# Altium PCB PCB1.PcbDoc
Units mm, origin at the board's own origin, x right, y up, seen from the top; angles counter-clockwise.
Board outline 50 x 35 mm, 2 copper layers (Top Layer, Bottom Layer); 40 components, 19 nets, 116 pads, 11 vias.
Unrouted connection lines stored in the file: 2.
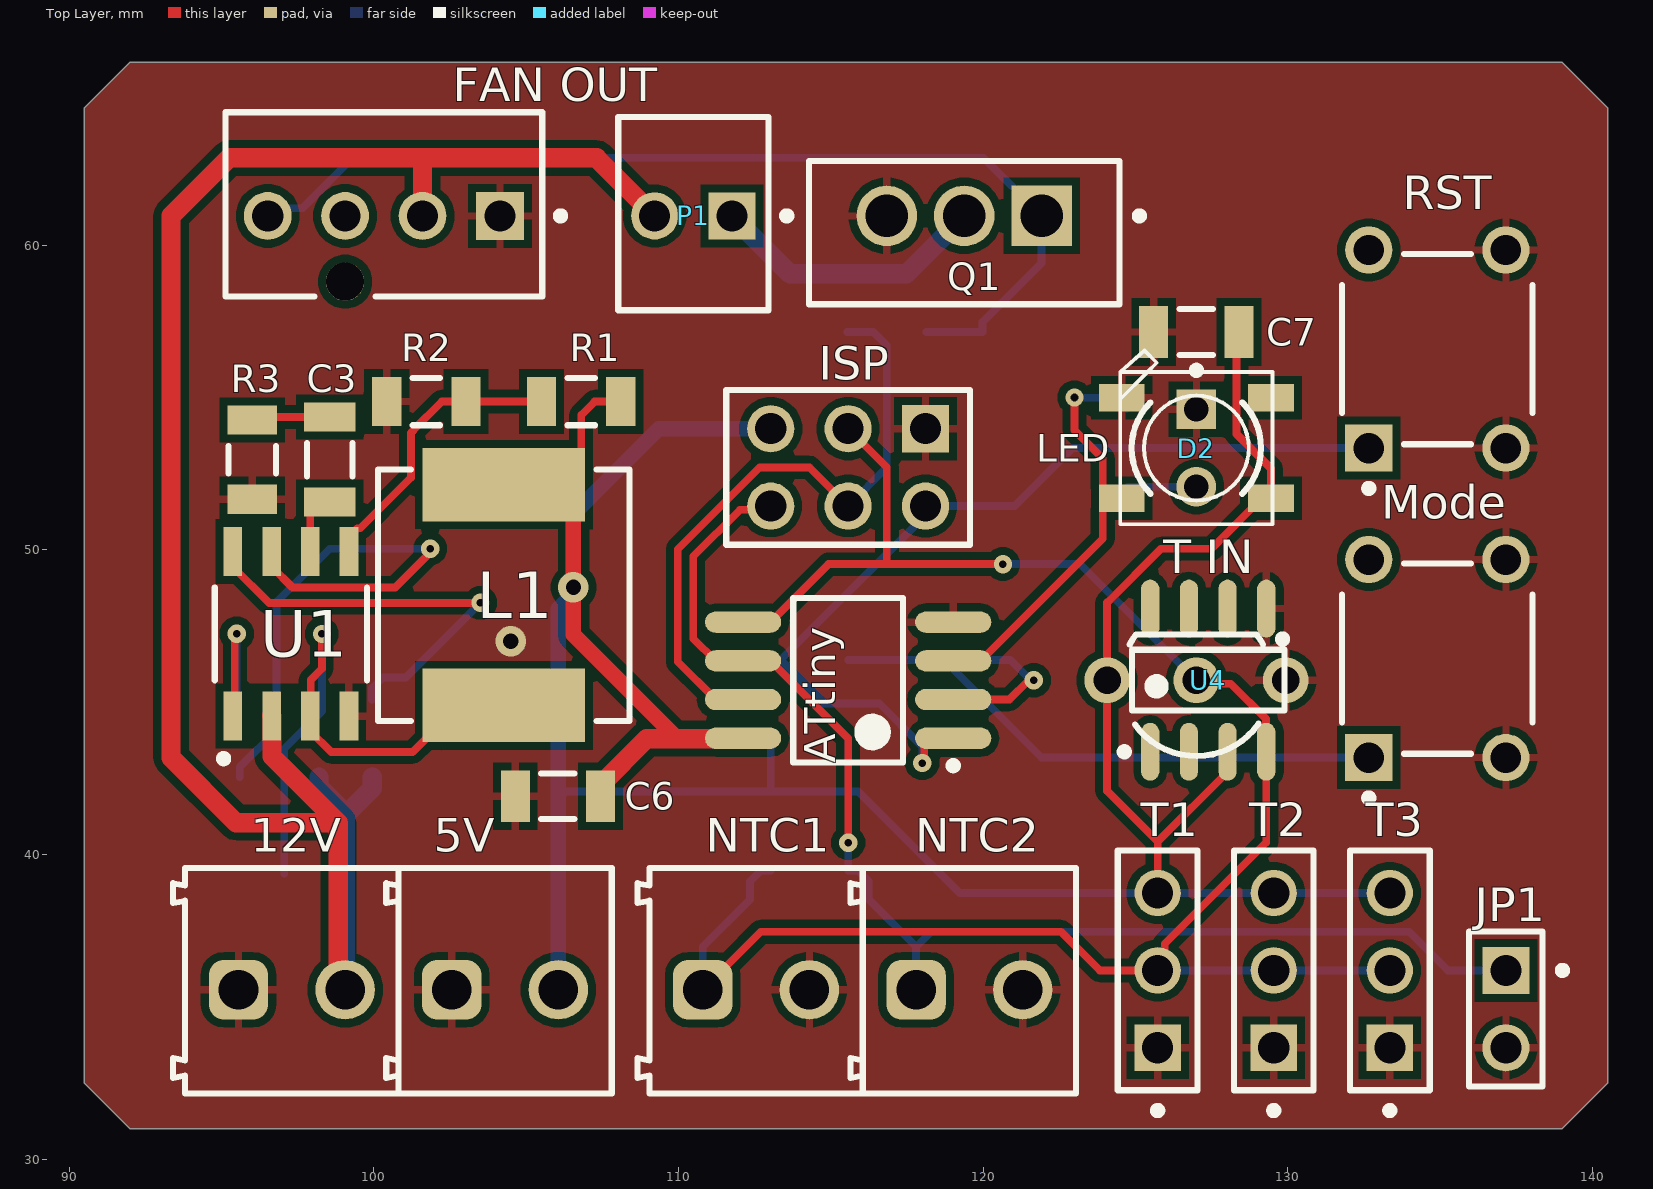
[diagram p0: Top Layer view]
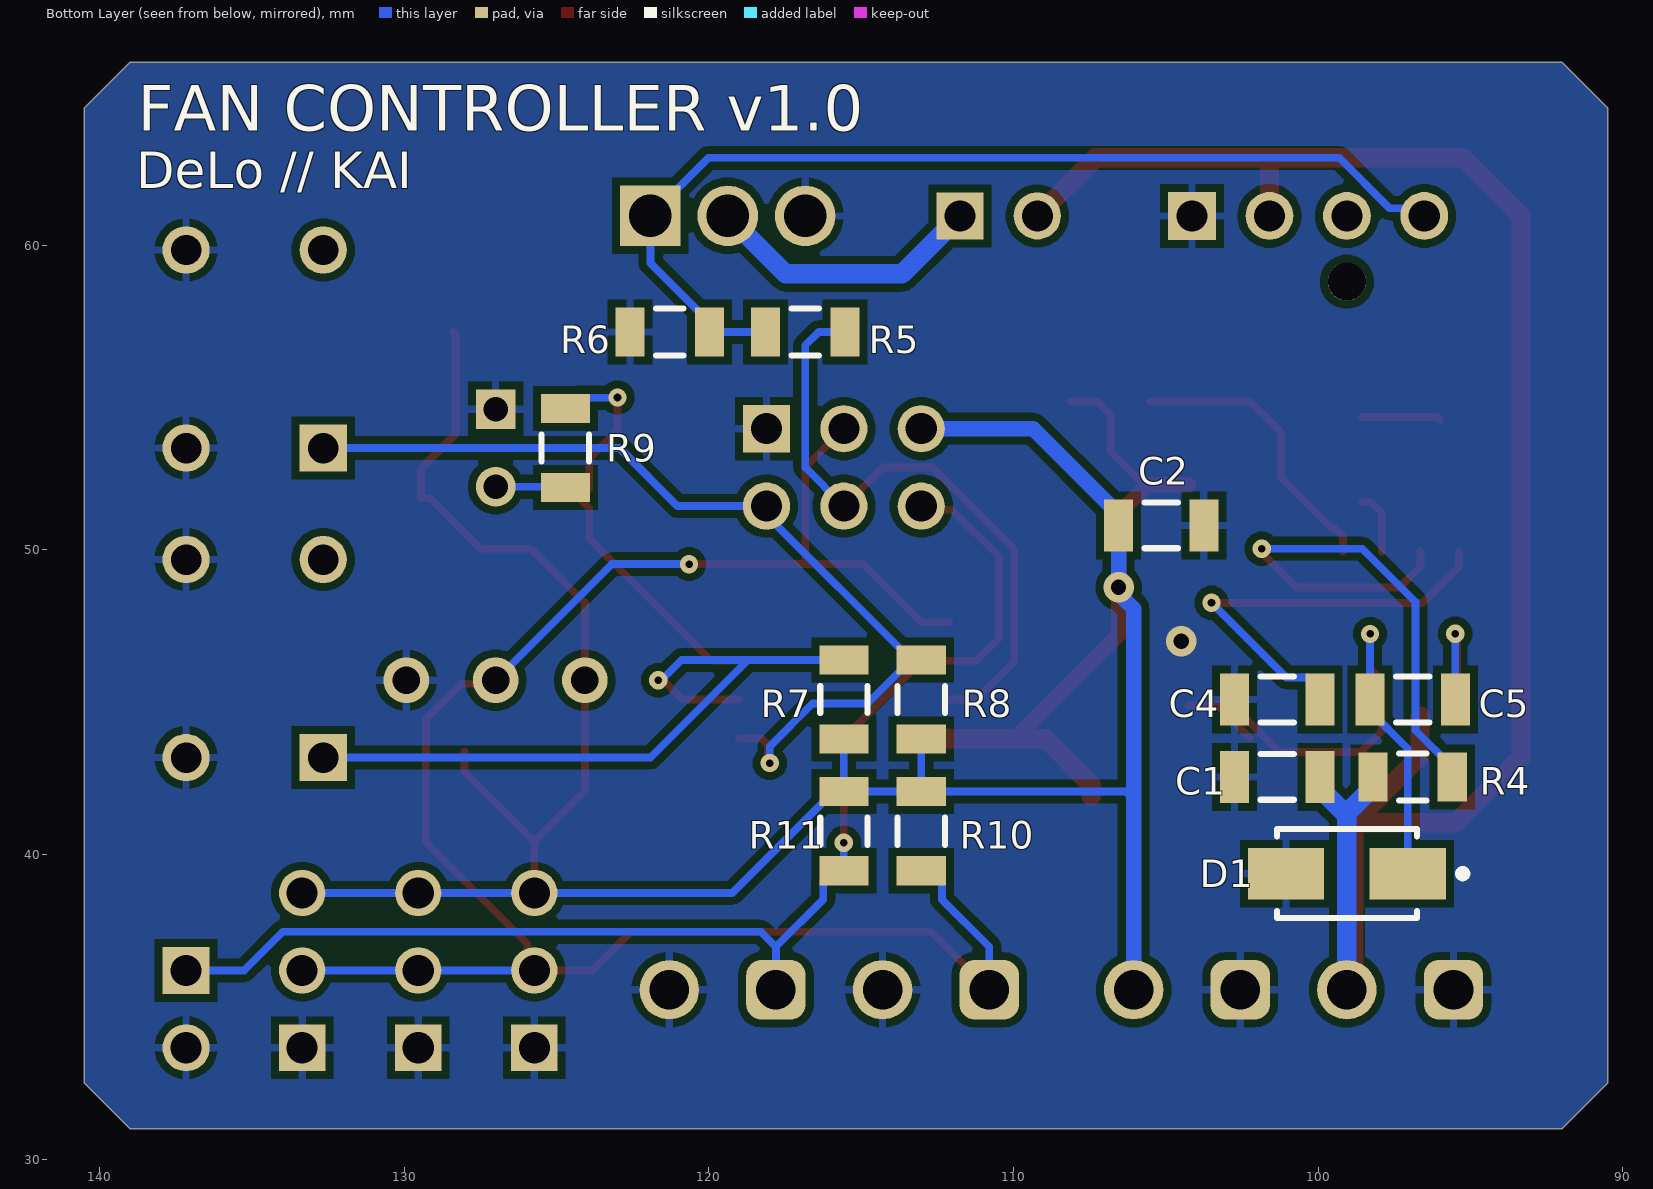
[diagram p1: Bottom Layer view, seen from below]
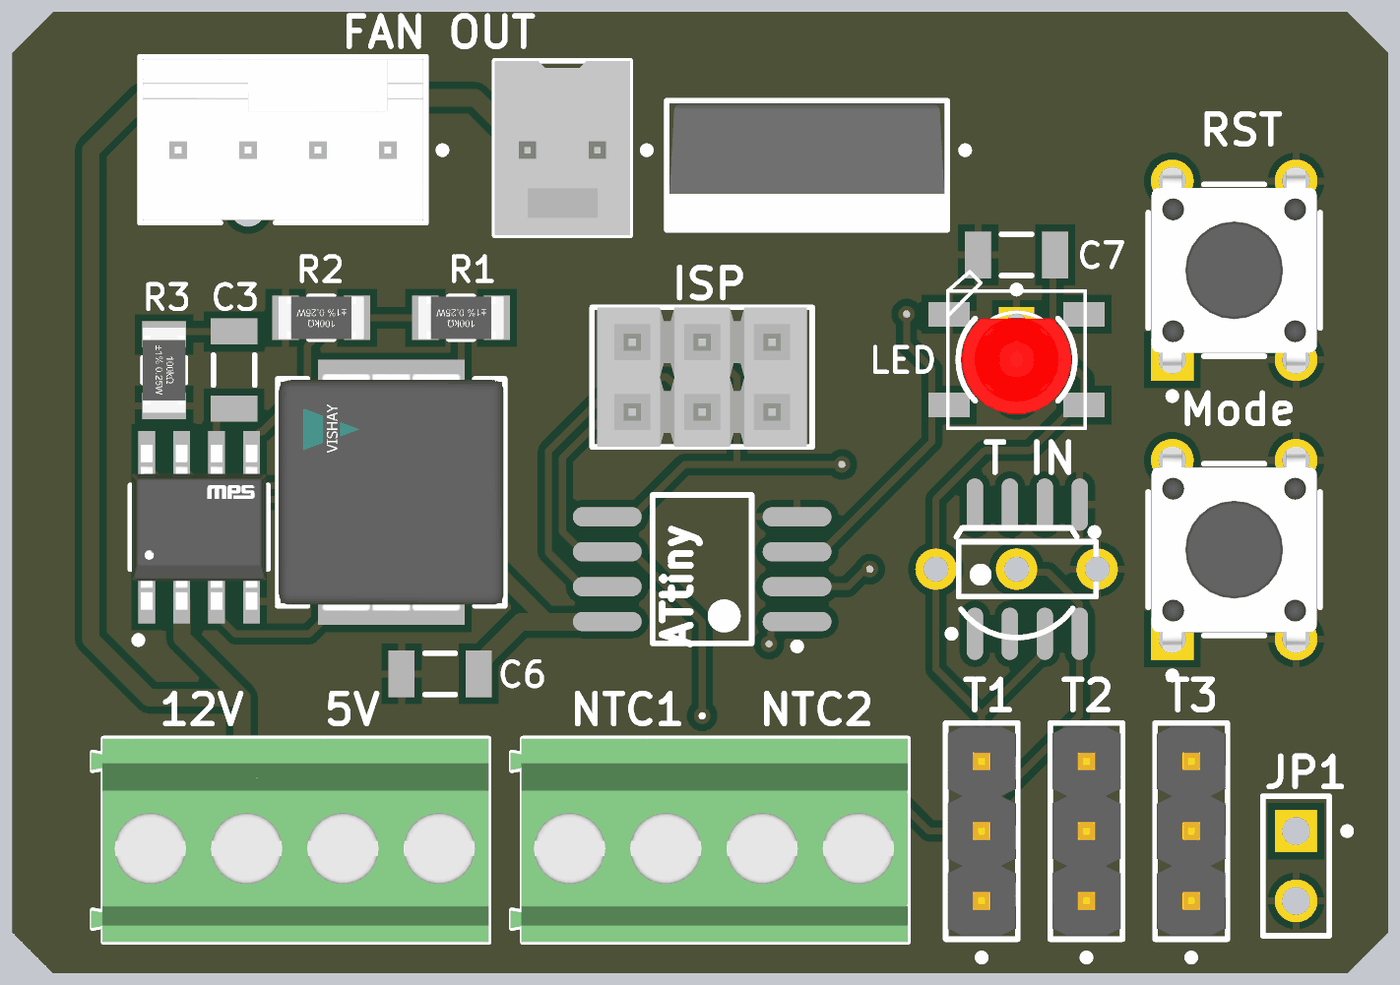
[diagram p2: 3D render of the assembled board from above, using the file's embedded part models]
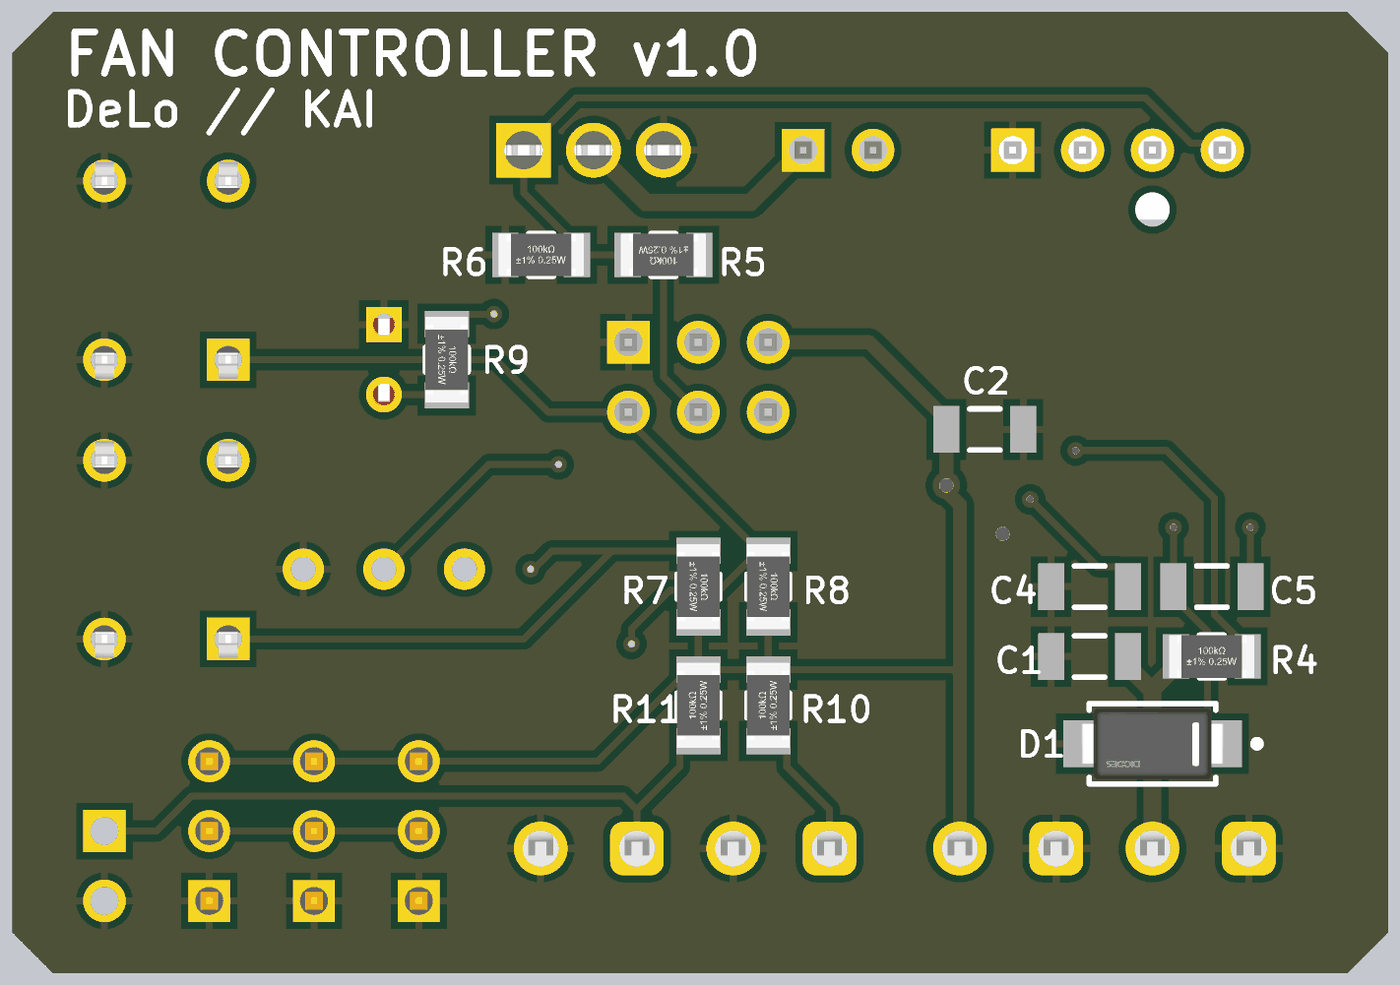
[diagram p3: 3D render of the assembled board from below, using the file's embedded part models]

## Layer stack, top to bottom
Top Solder: solder mask 0.0102, Solder Resist, Dk 3.5
Top Layer: signal copper 0.0356
Dielectric 1: dielectric 0.32, FR-4, Dk 4.8
Bottom Layer: signal copper 0.0356
Bottom Solder: solder mask 0.0102, Solder Resist, Dk 3.5

## Board outline
90.5,32.5 92,31 139,31 140.5,32.5 140.5,64.5 139,66 92,66 90.5,64.5

## Design rules (kind name [scope] priority, off if disabled: settings)
Clearance [All] p1: gap=0.254 ignorepadtopadclearanceinfootprint=FALSE
PolygonConnect [All] p1: connectstyle=Relief reliefconductorwidth=0.254 reliefentries=4 polygonreliefangle="90 Angle" airgapwidth=0.254
RoutingVias via [All] p1: holewidth=0.25 width=0.6 viastyle="Through Hole" minholewidth=0.2 minwidth=0.5 maxholewidth=0.711 maxwidth=1.27
RoutingVias [All] p2: holewidth=0.711 width=1.27 viastyle="Through Hole" minholewidth=0.711 minwidth=1.27 maxholewidth=0.711 maxwidth=1.27
SolderMaskExpansion SolderMaskExpansion_vias [IsVia] p1: expansion=0 istentingtop=TRUE
SolderMaskExpansion [All] p2: expansion=0 istentingtop=FALSE
SupplyNets "Schematic Supply Nets_2" [InNet('+12')] p1: voltage=0.000
SupplyNets "Schematic Supply Nets_1" [InNet('NTC1-2')] p2: voltage=0.000
SupplyNets "Schematic Supply Nets" [InNet('+5')] p3: voltage=0.000
Width [All] p1: maxlimit=1.27 minlimit=0.152 preferedwidth=0.254
30 further rules are at their usual default settings.

## Classes and differential pairs
component class PWM: "FAN OUT" P1 Q1 R5 R6
component class Power: C1 C2 C3 C4 C5 D1 L1 R1 R2 R3 R4 U1
component class Ports_and_pins: 5V 12V NTC1 NTC2 T1 T2 T3
component class Logic: ATtiny C6 C7 D2 ISP JP1 LED Mode R7 R8 R9 R10 R11 RST "T IN" U4

## Components (designator, comment, footprint, x,y, rotation, side; value= is the part's Value field where it differs from the comment)
5V "5V" 691214110002 104.31,35.86 r0 top (schematic designator J6)
12V "12V" 691214110002 97.31,35.86 r0 top (schematic designator J2)
ATtiny "ATtiny13-20SUR" 8S2_M 115.57,45.72 r180 top (schematic designator U2)
C1 "10uF 25V" CAPC1206(3216)100_L 101.346,42.545 r0 bottom value=22nF
C2 "22uF 9V" CAPC1206(3216)100_L 105.156,50.8 r180 bottom value=22nF
C3 "3.3nF" CAPC1206(3216)100_L 98.552,52.962 r270 top value=22nF
C4 "0.1uF" CAPC1206(3216)100_L 101.346,45.085 r0 bottom value=22nF
C5 "10nF" CAPC1206(3216)100_L 96.901,45.085 r180 bottom value=22nF
C6 "100nF" CAPC1206(3216)100_L 106.045,41.91 r180 top value=22nF
C7 "10uF" CAPC1206(3216)100_L 127,57.15 r180 top value=22nF
D1 "B130-13-F" FP-SMA-MFG 99.06,39.37 r0 bottom
D2 "LTL-4222" FP-LTL-4222-MFG 127,53.34 r270 top
"FAN OUT" "47053-1000" FP-470531000-MFG 100.33,61.34 r0 top (schematic designator J1)
ISP "ISP" SMTC-MTSW-103-07-X-D-244 118.11,53.975 r180 top (schematic designator P2)
JP1 "Mode select" AMPH-68000-102HLF_V 137.16,34.925 r270 top
L1 "10uH" FP-IHLP-3232DZ-FP_2_413x5-MFG 104.267,48.514 r90 top
LED "WS2812B" *WS2812B_WS2812B(Primary) 127,53.34 r0 top (schematic designator LED1)
Mode "Mode" FP-TL1105AF160Q-MFG 134.91,46.43 r90 top (schematic designator SW1)
NTC1 "NTC1" 691214110002 112.55,35.86 r0 top (schematic designator J7)
NTC2 "NTC2" 691214110002 119.55,35.86 r0 top (schematic designator J8)
P1 "22-23-2021" MOLX-22-23-2021_V 110.49,60.96 r180 top
Q1 "IRFZ44N" TO220 119.38,60.96 r180 top
R1 "47K 1%" FP-CRGCQ1206-IPC_C 106.807,54.864 r180 top value=100KΩ
R2 "12K 1%" FP-CRGCQ1206-IPC_C 101.727,54.864 r180 top value=100KΩ
R3 "5.6K" FP-CRGCQ1206-IPC_C 96.012,52.959 r270 top value=100KΩ
R4 "100K" FP-CRGCQ1206-IPC_C 96.901,42.545 r180 bottom value=100KΩ
R5 "220Ohm" FP-CRGCQ1206-IPC_C 116.84,57.15 r0 bottom value=100KΩ
R6 "10K" FP-CRGCQ1206-IPC_C 121.285,57.15 r180 bottom value=100KΩ
R7 "10K" FP-CRGCQ1206-IPC_C 115.57,45.085 r270 bottom value=100KΩ
R8 "10K" FP-CRGCQ1206-IPC_C 113.03,45.085 r270 bottom value=100KΩ
R9 "220Ohm" FP-CRGCQ1206-IPC_C 124.714,53.34 r270 bottom value=100KΩ
R10 "10K" FP-CRGCQ1206-IPC_C 113.03,40.767 r90 bottom value=100KΩ
R11 "10K" FP-CRGCQ1206-IPC_C 115.57,40.767 r90 bottom value=100KΩ
RST "RST" FP-TL1105AF160Q-MFG 134.91,56.59 r90 top (schematic designator SW2)
T1 "1-Wire 1" FP-MTLW-103-07-G-S-230-MFG 125.73,36.195 r90 top (schematic designator J3)
T2 "1-Wire 2" FP-MTLW-103-07-G-S-230-MFG 129.54,36.195 r90 top (schematic designator J4)
T3 "1-Wire 3" FP-MTLW-103-07-G-S-230-MFG 133.35,36.195 r90 top (schematic designator J5)
"T IN" "DS18B20-PAR+T&R" Q3+4 127,45.72 r90 top (schematic designator U3)
U1 "MP1482DS-LF-Z" FP-MP1482DS-LF-Z-MFG 97.282,47.244 r90 top
U4 "DS18B20Z+" MAXM-S8+2_L 127.39,45.72 r90 top

## Footprints (in the part's own frame and the unit in brackets; to place one, negate y for a bottom-side part, rotate by r counter-clockwise, add the part's x,y. Pads: shape width x height; smd on the part's side, far side on the other; paste and mask are expansions set on the pad)
8S2_M [mm] "SOP, 8-Leads, Body 5.3x5.3mm, Pitch 1.27mm, IPC Low Density"
  oval 2.5x0.7 smd: 1(-3.45,1.905) 2(-3.45,0.635) 3(-3.45,-0.635) 4(-3.45,-1.905) 5(3.45,-1.905) 6(3.45,-0.635) 7(3.45,0.635) 8(3.45,1.905)
  silkscreen extent -3.57,-2.7 1.8,2.93, body extent -2.7,-2.68 2.7,2.68, height 2.16
691214110002 [mm] "3.50 mm Horizontal Entry Modular, 2p"
  rrect50% 1.95x1.95 hole 1.3: 1(-1.75,-0.3)
  round 1.95 hole 1.3: 2(1.75,-0.3)
  silkscreen extent -3.9,-3.7 3.5,3.7, body extent -3.95,-3.7 3.5,3.7, height 8.55
*WS2812B_WS2812B(Primary) [mm]
  rect 1.5x0.9 smd: 1-VDD(2.45,-1.65) 2-DOUT(2.45,1.65) 3-GND(-2.45,1.65) 4-DIN(-2.45,-1.65)
  silkscreen extent -2.5,-2.5 2.5,3.2
AMPH-68000-102HLF_V [mm] "THD, 2-Leads, Body 5.08x2.41mm, Pitch 2.54mm"
  rect 1.55x1.55 hole 1.02: 1(-1.27,0)
  round 1.55 hole 1.02: 2(1.27,0)
  silkscreen extent -2.54,-1.2 2.54,1.98, body extent -2.54,-1.2 2.54,1.2, height 8.38
CAPC1206(3216)100_L [mm] "Chip Capacitor, Body 3.2x1.6mm, Height 1mm, IPC High Density"
  rect 0.95x1.7 smd: 1(-1.4,0) 2(1.4,0)
  silkscreen extent -0.55,-0.75 0.55,0.75, body extent -1.7,-0.9 1.7,0.9, height 1
FP-470531000-MFG [mm]
  rect 1.57x1.57 hole 1.02 paste-2539.97 mask+0: 1(3.81,-0.38)
  round 1.57 hole 1.02 paste-2539.97 mask+0: 2(1.27,-0.38) 3(-1.27,-0.38) 4(-3.81,-0.38)
  round 1.25 hole 1.25 unplated paste-2539.97 mask+0: ""(-1.27,-2.54)
  silkscreen extent -5.2,-3.02 5.93,3.02, body extent -5.3,-3.26 5.3,3.12, height 0.25
FP-CRGCQ1206-IPC_C [mm]
  rect 0.956x1.61 smd paste+0 mask+0: 1(-1.301,0) 2(1.301,0)
  silkscreen extent -0.45,-0.77 0.45,0.77, body extent -1.88,-0.95 1.88,0.95, height 0.25
FP-IHLP-3232DZ-FP_2_413x5-MFG [mil]
  rect 95x210 smd paste+0 mask+0: 1(-142.5,0) 2(142.5,0)
  silkscreen extent -163,-163 163,163, body extent -194,-166 194,166, height 10
FP-LTL-4222-MFG [mm]
  rect 1.3x1.3 hole 0.8 paste-2539.97 mask+0: 1(-1.27,0)
  round 1.3 hole 0.8 paste-2539.97 mask+0: 2(1.27,0)
  silkscreen extent -2.67,-2.12 1.5,2.12, body extent -2.22,-2.22 2.22,2.22, height 0.25
FP-MP1482DS-LF-Z-MFG [mm]
  rect 1.6x0.61 smd paste+0 mask+0: 1(-2.7,1.905) 2(-2.7,0.635) 3(-2.7,-0.635) 4(-2.7,-1.905) 5(2.7,-1.905) 6(2.7,-0.635) 7(2.7,0.635) 8(2.7,1.905)
  silkscreen extent -4.22,-2.5 1.53,2.5, body extent -3.6,-2.6 3.6,2.6, height 0.25
FP-MTLW-103-07-G-S-230-MFG [mm]
  rect 1.52x1.52 hole 1.02 paste-2539.97 mask+0: 1(-2.54,0)
  round 1.52 hole 1.02 paste-2539.97 mask+0: 2(0,0) 3(2.54,0)
  silkscreen extent -4.72,-1.31 3.94,1.31, body extent -4.04,-1.41 4.04,1.41, height 0.25
FP-SMA-MFG [mm]
  rect 2.5x1.7 smd paste+0 mask+0: 1(-2,0) 2(2,0)
  silkscreen extent -3.92,-1.46 2.3,1.46, body extent -2.6,-1.3 2.6,1.3, height 2.4
FP-TL1105AF160Q-MFG [mm]
  rect 1.55x1.55 hole 1 paste-2539.97 mask+0: 1(-3.25,2.25)
  round 1.55 hole 1 paste-2539.97 mask+0: 2(3.25,2.25) 3(-3.25,-2.25) 4(3.25,-2.25)
  silkscreen extent -4.7,-3.13 3.13,3.13, body extent -4.13,-3.22 4.13,3.22, height 0.25
MAXM-S8+2_L [mm] "SOIC, 8-Leads, Body 4.90x3.90mm, Pitch 1.27mm, IPC High Density"
  oval 1.9x0.6 smd: 1(-2.35,1.905) 2(-2.35,0.635) 3(-2.35,-0.635) 4(-2.35,-1.905) 5(2.35,-1.905) 6(2.35,-0.635) 7(2.35,0.635) 8(2.35,1.905)
  silkscreen extent -2.47,-2.5 1,2.88, body extent -2,-2.5 2,2.5, height 1.75
MOLX-22-23-2021_V [mm] "THD, 2-Leads, Body 6.35x4.93mm, Pitch 2.54mm"
  rect 1.55x1.55 hole 1.02: 1(-1.27,0)
  round 1.55 hole 1.02: 2(1.27,0)
  silkscreen extent -3.19,-3.25 2.46,3.1, body extent -2.46,-3.25 2.46,3.1, height 10.66
Q3+4 [mm] "TO, Flat Index; 3 In-Line, Formed Axial Leads; Body Dia. 4.7mm; Leads 0.56 x 0.51 mm (max)"
  round 1.5 hole 0.9: 1(0,-2.93) 2(0,0) 3(0,2.93)
  silkscreen extent -2.49,-2.96 1.5,2.19, body extent -2.48,-2.5 1.5,2.5, height 9.4
SMTC-MTSW-103-07-X-D-244 [mm] "Assembly .025\" [.64] SQ Post Terminal Strip, 2x3 Pins, Vertical, 2.54mm Pitch, Male"
  rect 1.55x1.55 hole 1.02: 1(0,0)
  round 1.55 hole 1.02: 2(0,2.54) 3(2.54,0) 4(2.54,2.54) 5(5.08,0) 6(5.08,2.54)
  silkscreen extent -1.46,-1.27 6.54,3.81, body extent -1.27,-1.27 6.35,3.81, height 8.74
TO220 [mm] "TO,flange mount,2.54 mm pitch, 3 pin, 10.16 mm L X 4.57 mm W X 20.56 mm H body"
  rect 1.99x1.99 hole 1.39 paste-2539.97 mask+0: 1(-2.54,0)
  round 1.99 hole 1.39 paste-2539.97 mask+0: 2(0,0) 3(2.54,0)
  silkscreen extent -5.87,-1.8 5.1,2.9, body extent -5.16,-1.72 5.16,2.86, height 19.84

## Part data
5V 12V NTC1 NTC2: library part CMP-1502-02464-3, "2141 Series 3.5MM Pitch Straight, Pcb Terminal Block, Through Hole, 2 Way", Color="Blue, Green", Current=10A, Max Operating Temperature=105°C, Min Operating Temperature=-40°C, Voltage=300V, Contact Material=Tin, Contact Plating="Brass, Tin", Current Rating=10A, Height=8.7mm, Housing Material=Nylon, Lead Pitch=3.5mm, Length=7.4mm, Mount="Through Hole", Number of Contacts=2, Number of Levels=1, Number of Pins=2, Number of Positions Per Level=2, Number of Rows=1, Packaging=Box, Pitch=3.5052mm, Plating="Brass, Steel", RoHS=Compliant, Stripping Length=-6mm, Termination=Screw, Voltage Rating=300V, Width=7.9mm, Wire Gauge (Max)=24AWG, Wire Gauge (Min)=16AWG, Wire/Cable Gauge=24AWG
ATtiny: library part CMP-0093-00337-1, "8-bit AVR Microcontroller, 2.7-5.5V, 1KB Flash, 64 Bytes EEPROM, 64 Bytes SRAM, 8-pin SOIC, Industrial Grade (-40°C to 85°C), Pb-Free, Reel", ComponentLink1Description="Manufacturer URL", ComponentLink1URL=http://www.atmel.com/, ComponentLink2Description="ATtiny13  Datasheet", ComponentLink2URL=http://www.atmel.com/dyn/resources/prod_documents/doc2535.pdf, ComponentLink3Description="ATtiny13 Summary", ComponentLink3URL=http://www.atmel.com/dyn/resources/prod_documents/2535S.pdf, DatasheetVersion="revJ, Aug-2010", PackageDescription="8-Lead, 0.208\" Body, Plastic Small Outline Package (EIAJ)", PackageReference=8S2, PackageVersion="revF, Apr-2008"
C1 C2 C3 C4 C5 C6 C7: library part CMP-1037-03755-1, "CAP 22nF 25V ±10% 1206 (3216 Metric) Thickness 1mm SMD", Case-EIA=1206, Case-Metric=3216, Rated Voltage="25 V", Tolerance=Â±10%, Max Thickness="1 mm", Technology=SMT
D1: library part CMP-2000-05883-2, "DIODE SCHOTTKY 30V 1A SMA", Average Rectified Current=1A, Capacitance=110pF, Case/Package=SMA, Forward Voltage=500mV, Max Forward Surge Current (Ifsm)=30A, Max Operating Temperature=150°C, Max Repetitive Reverse Voltage (Vrrm)=30V, Min Operating Temperature=-65°C, Package Quantity=5000, Peak Reverse Current=500uA, Current Rating=1A, Element Configuration=Single, Forward Current=1A, Height=2.1mm, Lead Free="Lead Free", Length=4.6mm, Max Reverse Voltage (DC)=30V, Mount="Surface Mount", Number of Pins=2, Output Current=1A, Packaging="Tape and Reel", Peak Non-Repetitive Surge Current=30A, Polarity=Standard, Radiation Hardening=No, REACH SVHC="No SVHC", Termination=SMD/SMT, Voltage Rating (DC)=30V, Weight=0.002258oz, Width=2.92mm
D2: library part CMP-22017-000043-1, "LED RED CLEAR T-1 T/H", Case/Package=T, Color=Red, Forward Current=20mA, Forward Voltage=2V, Max Operating Temperature=100°C, Min Operating Temperature=-55°C, Package Quantity=1000, Power Dissipation=100mW, Reverse Voltage=5V, Test Current=10mA, Depth=4mm, Dominant Wavelength=623nm, Height=6.55mm, Illumination Color=Red, Length=4mm, Lens Color=Red, Lens Style=Dome, Lens Transparency=Clear, Luminous Intensity=29mcd, Mount="Through Hole", Number of Elements=1, Number of LEDs=1, Number of Pins=2, Packaging=Bulk, Radiation Hardening=No, RoHS Compliant=Yes, Series=-, Viewing Angle=20°, Wavelength=635nm
"FAN OUT": library part CMP-04776-000290-2, "CONN HEADER VERT 4POS 2.54MM", Ambient Temperature Range High=105°C, Current Rating=500mA, Housing Color=Beige, Manufacturer Lifecycle Status=ACTIVE, Max Operating Temperature=75°C, Min Operating Temperature=0°C, Voltage Rating=250V, Contact Material="Brass, Copper", Contact Plating=Tin, Country of Origin=HK, Depth=5.84mm, Gender=Male, Glow Wire Compliant=Non-compliant, Halogen Free="Low Halogen", Height=7.7mm, Housing Material=Nylon, Lead Pitch=2.54mm, Length=10.2mm, Lifecycle Status=Production, Mount="Through Hole", NexarPartId=854935, Number of Circuits=4, Number of Contacts=4, Number of Pins=4, Number of Positions=4, Number of Rows=1, Orientation=Vertical, Packaging=Bulk, Pitch=2.54mm, Plating=Copper, Radiation Hardening=No, REACH SVHC=Unknown, RoHS=Compliant, Schedule B="8536694040, 8536694040", Termination="Through Hole", Voltage Rating (DC)=250V
ISP: library part CMP-1024-00098-1, "Modified .025\" SQ Post Header, Through-hole, Vertical, -55 to 125 degC, 2.54 mm Pitch, 6-Pin, Male, RoHS", Manufacturer=Samtec, PartNumber=MTSW-103-07-F-D-244, Temperature Range="-55 to 125 degC", ComponentLink1Description="Manufacturer URL", ComponentLink1URL=http://www.samtec.com, ComponentLink2Description=Datasheet, ComponentLink2URL=http://www.samtec.com/documents/webfiles/pdf/MTSW.PDF, ComponentLink3Description="Package Specification", ComponentLink3URL=http://www.samtec.com/documents/webfiles/cpdf/MTSW-XXX-XX-X-X-XXXX-XX-XXX-MKT1.pdf, DatasheetVersion=F-214, Mounting Technology=Through-hole, Orientation=Vertical, PackageDescription="Assembly .025\" [.64] SQ Post Terminal Strip", PackageReference=MTSW-103-07-X-D-244, PackageVersion="BI, 2/1987", Pitch="2.54 mm", RoHS=True
JP1: library part CMP-2000-05666-1, "Male Header, Pitch 2.54 mm, 1 x 2 Position, Height 8.38 mm, Tail Length 2.41 mm, RoHS, Bulk", Current Rating=3A, Flammability Rating=UL94V-0, Insulation Resistance=5000MOhms, Manufacturer=FCI, Operating Temperature Range=-65Cto+125C, Package Description="Male Header, Pitch 2.54 mm, 1 x 2 Position, Height 8.38 mm, Tail Length 2.41 mm", Package Reference=68000-102HLF, Voltage Rating=1.5kV, Brand=FCI, Contact Gender=Pin(Male), Contact Material=PhosphorBronze, Contact Plating=Gold/GTX, Datasheet URL=https://datasheet.ciiva.com/5149/68000-274228-5149165.pdf, Datasheet Version="Rev. F, 04/2006", Factory Pack Quantity=100, Housing Material=Thermoplastic, Manufacturer URL=http://www.amphenol.com/, Mating Post Length=5.84mm, Mounting Angle=Vertical, Mounting Style=ThroughHole, Mounting Technology=ThroughHole, Number of Positions=2, Number of Positions / Contacts=2, Number of Rows=1, Packaging=Bulk, Pitch=2.54mm, Product Category=Headers&WireHousings, Product Type=Headers, RoHS=Details, Series=68000, Termination Post Length=2.41mm, Termination Style=ThroughHole, Type=Unshrouded
L1: library part CMP-02424-000031-1, "Automotive Inductors, Low DCR Series 10uH 5.4A 51.8mΩ 20%"
LED: "Intelligent control LED integrated light source", Package=None, Check_prices=https://www.snapeda.com/parts/WS2812B/Worldsemi/view-part/?ref=eda, MF=Worldsemi, MP=WS2812B, SnapEDA_Link=https://www.snapeda.com/parts/WS2812B/Worldsemi/view-part/?ref=snap
Mode RST: library part CMP-17879-000016-1, "SWITCH TACTILE SPST-NO 0.05A 12V", Color=Black, Contact Current Rating=50mA, Contact Resistance=100mR, Max Operating Temperature=70°C, Max Voltage Rating (DC)=50V, Min Operating Temperature=-20°C, Operating Force=160gf, Package Quantity=750, Voltage Rating (DC)=12V, Actuator Length=1.4mm, Actuator Material=Nylon, Actuator Type=Standard, Contact Material=Bronze, Contact Plating=Silver, Current Rating=50mA, Electrical Life=100000Cycles, Housing Material=Nylon, Illumination Type=Non-Illuminated, Lead Free="Lead Free", Length=6mm, Mechanical Life=100000Cycles, Mount="Through Hole", Orientation=Straight, Packaging=Bulk, Reach SVHC Compliant=Yes, RoHS Compliant=Yes, Series=TL1105, Size=6mm, Switch Function=Off-Mom, Switch Travel=0.25mm, Termination="PC Pin", Throw Configuration=SPST, Width=6mm
P1: library part CMP-1704-00001-3, "Male Header, Pitch 2.54 mm, 1 x 2 Position, Height 10.67 mm, Tail Length 3.56 mm, 0 to 75 degC, RoHS, Bulk", Max Operating Temperature="75 degC", Min Operating Temperature="0 degC", Package Quantity=3000, ComponentLink1Description="Manufacturer URL", ComponentLink1URL=http://www.molex.com/, ComponentLink2Description=Datasheet, ComponentLink2URL=https://datasheet.ciiva.com/19454/232266-19454304.pdf, Height="10.67 mm", Length="5.08 mm", Mount="Through Hole", Mounting Technology="Through Hole", PackageDescription="Male Header, Pitch 2.54 mm, 1 x 2 Position, Height 10.67 mm, Tail Length 3.56 mm", Packaging=Bulk, PartNumber=22-23-2021, Pins=2, Radiation Hardening=No, REACH SVHC=Unknown, RoHSCompliant=True, Width="6.35 mm"
Q1: "OptiMOS 3 Power-Transistor, VDS 100V", Manufacturer="Infineon Technologies", Manufacturer Order Number=IRFZ44N, PackageReference=PG-TO220-3-904
R1 R2 R3 R4 R5 R6 R7 R8 R9 R10 R11: library part CMP-03211-000249-1, "CRGCQ1206 100KΩ 0.25W 1% ±100ppm/°C 200V", Ambient Temperature Range High=+70°C, Manufacturer="TE Connectivity", Manufacturer Part Number=CRGCQ1206F100K, Package=CRGCQ1206, Power Rating=0.25W, Resistance=100KΩ, Temperature="-55°C to +155°C", Temperature Coefficient=±100ppm/°C, Temperature Range High=+155°C, Temperature Range Low=-55°C, Tolerance=0.01, Voltage Rating=200V, Automotive=Yes, Automotive Grade="Grade 1141", Category=Res, ComponentLink2Description=Datasheet, ComponentLink2URL=https://www.te.com/commerce/DocumentDelivery/DDEController?Action=showdoc&DocId=Data+Sheet%7F1773204-3%7F1%7Fpdf%7FEnglish%7FENG_DS_1773204-3_1.pdf%7F4-2176347-1150, Composition="Thick Film", Device Class L1="Passive Components", Device Class L2=Resistors, Device Class L3="Chip SMD Resistors", Height=0.65mm, Ipc Land Pattern Name=RESC310155X55, Lead Free=Yes, Octopart=https://octopart.com/crgcq1206f100k-te+connectivity-91018242, RoHS=TRUE, Series=CRGCQ
T1 T2 T3: library part CMP-02766-001679-1, "CONN HEADER VERT 3POS 2.54MM", Housing Color=Black, Max Current Rating=3A, Max Operating Temperature=125°C, Min Operating Temperature=-55°C, Contact Material=Bronze, Contact Plating=Gold, Depth=2.48mm, Gender=Male, Housing Material=Polymer, Length=7.62mm, Number of Contacts=3, Number of Rows=1, Orientation=Straight, Packaging=Bulk, Pitch=2.54mm, Radiation Hardening=No, RoHS Compliant=Yes, Termination=Solder
"T IN": library part CMP-0253-00002-1, "High-Precision Parasite-Power Digital Thermometer, 1-Wire Interface, ±0.5°C Accuracy, 3-Pin TO92, -55°C to +125°C, Tape and Reel, Pb-Free", Code_JEDEC=TO-226-AA, ComponentLink1Description="Manufacturer URL", ComponentLink1URL=http://www.maxim-ic.com, ComponentLink2Description=Datasheet, ComponentLink2URL=http://datasheets.maxim-ic.com/en/ds/DS18B20-PAR.pdf, DatasheetVersion=2007, PackageDescription="TO-92 Package, Formed Leads, Body Dia. 4.7mm; Leads 0.51 x 0.51 mm (max), Pb-Free", PackageReference=Q3+4, PackageVersion="revB, 2010"
U1: library part CMP-57379-000001-1, "IC REG BUCK ADJUSTABLE 2A 8SOIC", Ambient Temperature Range High=+85°C, Ambient Temperature Range Low=-40°C, Manufacturer="Monolithic Power Systems", Max Junction Temp=+125°C, Max Power Dissipation=1.38W, Max Supply Voltage=18V, Min Supply Voltage=4.75V, Nominal Supply Current=1.3mA, Output Current=2A, Output Voltage=0.923-15V, Package=0, Switching Frequency=340kHz, Temperature="-40°C to +125°C", Automotive=No, Category=IC, ComponentLink2Description=Datasheet, ComponentLink2URL=https://www.monolithicpower.com/en/documentview/productdocument/index/version/2/document_type/Datasheet/lang/en/sku/MP1482/document_id/344/, Device Class L1="Integrated Circuits (ICs)", Device Class L2="Power Management ICs", Device Class L3="Voltage Regulators - Switching", Digikey Description="IC REG BUCK ADJUSTABLE 2A 8SOIC", Height=1.75mm, Ipc Land Pattern Name=SOIC127P600X155-8, Lead Free=Yes, Manufacturer Part Number=MP1482DS-LF-Z, Max Duty Cycle=90%, Mouser Description="MP1482 Series 18 V 2 A SMT Synchronous Rectified Step-Down Converter-SOIC-8", Number Of Outputs=1, Octopart=https://octopart.com/mp1482ds-lf-z-monolithic+power+systems-17392490, Output Type=AdjustableProgrammable, RoHS=TRUE, Standoff Height=0.1mm, Switching Topology=Buck, Temperature Range High=+125°C, Temperature Range Low=-40°C
U4: library part CMP-0253-00019-2, "High-Precision 1-Wire Digital Thermometer, -55 to 125 degC, 8-Pin SOIC (S8+2), Pb-Free", Generic Part Number=DS18B20, Temp. Thresh.="Programmable (NV)", Code_JEDEC=MS012, ComponentLink1Description="Manufacturer URL", ComponentLink1URL=http://www.maximintegrated.com/, ComponentLink2Description=Datasheet, ComponentLink2URL=http://datasheets.maximintegrated.com/en/ds/DS18B20.pdf, ComponentLink3Description="Package Specification", ComponentLink3URL=http://pdfserv.maximintegrated.com/package_dwgs/21-0041.PDF, DatasheetVersion="Rev. 4", Interface=1-Wire, Mounting Technology="Surface Mount", Multi Droppable=Yes, PackageDescription="8-Pin Small-Outline IC, Narrow (0.15in) (S8+2), Body 4.90 x 3.90 mm, Pitch 1.27 mm", PackageReference=S8+2, PackageVersion="Rev. D, 10/2012", Parasite Pwr.=Yes, PartNumber=DS18B20Z+, RoHS=Pb-Free, Sensor Type=Local

## Via types
v1: diameter 0.6, hole 0.25, Top Layer to Bottom Layer, tented both sides, 9 vias
v2: diameter 1, hole 0.5, Top Layer to Bottom Layer, tented both sides, 2 vias

## Nets (pads, with @x,y where several pads share a name; then routed paths per layer and width w, separated by ;. In a path a pad name is that pad's centre, name@x,y a point inside that pad or via, vN(x,y) a via of type N, cw(c..) or ccw(c..) an arc to the next point about the centre after c; other vN are vias at no path point)
1-Wire/NTC1-1: "T IN.2" ATtiny.5 ISP.3 NTC1.1 R10.1 T1.2 T2.2 T3.2 U4.4 | length 63.7
  Top Layer w0.254: NTC1.1 112.705,37.465 122.555,37.465 123.825,36.195 T1.2 125.965,36.43 125.965,37.065 129.295,40.395 U4.4 129.286,43.379 129.286,44.45 128.131,45.605 127.115,45.605 127,45.72 ; ATtiny.5 113.02,47.625 114.925,49.53 116.84,49.53 ; ISP.3 116.84,52.705 116.84,49.53 ; v1(120.65,49.53) 116.84,49.53
  Bottom Layer w0.254: NTC1.1 110.8,36.972 112.352,38.524 112.352,39.115 112.703,39.466 R10.1 ; v1(120.65,49.53) 123.19,49.53 127,45.72 ; T1.2 T2.2 T3.2
+5: 5V.2 "T IN.3" ATtiny.8 C2.1 C6.1 C7.1 ISP.5 L1.2 LED.1-VDD R1.1 R7.2 R8.2 R10.2 R11.2 T1.3 T2.3 T3.3 U4.3 | length 104.3
  Top Layer w0.254: L1.2@105.727,52.133 106.807,53.213 106.807,54.422 107.249,54.864 R1.1 ; T1.3 125.73,40.425 ; U4.3 128.025,42.72 125.73,40.425 ; C7.1 128.319,57.069 128.319,53.799 129.45,52.668 LED.1-VDD 129.15,51.69 127.498,50.038 125.84,50.038 124.07,48.268 124.07,45.72 124.07,42.085 125.73,40.425
  Top Layer w0.508: L1.2 105.6,52.133 106.553,51.181 v2(106.553,48.768) 106.553,47.212 109.95,43.815 110.4,43.815
  Top Layer w0.635: C6.1 107.445,42.285 108.963,43.803 112.108,43.803 ATtiny.8
  Bottom Layer w0.254: 106.06,41.814 106.314,42.068 R10.2 ; R8.2 R10.2 ; R7.2 R11.2 ; T3.3 T2.3 T1.3 119.23,38.735 115.897,42.068 R11.2 ; R10.2 R11.2
  Bottom Layer w0.508: 5V.2 106.06,41.814 106.06,48.069 106.553,48.562 v2(106.553,48.768) 106.554,48.769 106.554,50.798 C2.1 106.556,51.175 109.356,53.975 ISP.5
+12: 12V.2 "FAN OUT.2" C1.1 P1.2 R4.1 U1.2 | length 62.5
  Top Layer w0.635: U1.2 96.659,44.532 96.659,43.223 98.839,41.044 ; 12V.2 98.839,35.781 98.839,41.044 ; 101.6,60.96 101.6,62.865 ; P1.2 107.315,62.865 101.6,62.865 ; 98.839,41.044 95.481,41.044 93.345,43.18 93.345,60.96 95.25,62.865 101.6,62.865
  Bottom Layer w0.635: R4.1 98.202,42.218 99.06,41.36 99.06,41.284 ; 12V.2 99.06,41.284 ; C1.1 99.946,42.17 99.06,41.284
GND: 5V.1 12V.1 "FAN OUT.1" "T IN.1" ATtiny.4 C1.2 C2.2 C4.2 C6.2 C7.2 D1.2 D2.1 ISP.1 JP1.2 LED.3-GND Mode.3 Mode.4 NTC1.2 NTC2.2 Q1.3 R2.2 R3.2 R6.1 RST.3 RST.4 T1.1 T2.1 T3.1 U1.4 U4.5
  other v2: 104.5,47
NetC3_1: C3.1 R3.1 | length 2.6
  Top Layer w0.254: R3.1 96.114,54.362 C3.1
NetC3_2: C3.2 U1.6 | length 2
  Top Layer w0.254: U1.6 97.917,51.214 98.265,51.562 C3.2
NetC4_1: C4.1 U1.8 | length 14.2
  Top Layer w0.254: U1.8 95.377,49.449 96.571,48.255 103.5,48.255 v1(103.505,48.26)
  Bottom Layer w0.254: C4.1 99.946,45.46 100.294,45.808 101.053,45.808 v1(103.505,48.26)
NetC5_1: C5.1 D1.1 L1.1 U1.3 | length 20.5
  Top Layer w0.254: v1(98.298,47.239) 98.298,46.095 97.928,45.725 97.928,44.555 U1.3 97.917,44.049 98.603,43.363 101.275,43.363 102.806,44.895 L1.1@103.314,44.895 ; L1.1@102.235,43.815 L1.1@103.314,44.895 ; L1.1 L1.1@103.314,44.895
  Bottom Layer w0.254: D1.1 97.06,43.469 98.301,44.71 C5.1 98.298,45.088 v1(98.298,47.239)
NetC5_2: C5.2 U1.1 | length 4.9
  Top Layer w0.254: U1.1 95.441,44.608 95.441,47.18 v1(95.504,47.244)
  Bottom Layer w0.254: C5.2 95.504,45.088 v1(95.504,47.244)
NetD2_2: D2.2 R9.2 | length 2.3
  Bottom Layer w0.254: R9.2 124.745,52.07 D2.2
NetJ1_4: "FAN OUT.4" Q1.1 R5.2 R6.2 | length 33.4
  Bottom Layer w0.254: 96.52,60.96 96.772,61.212 97.663,61.212 99.316,62.865 120.015,62.865 Q1.1 121.92,59.413 119.984,57.477 R6.2 R5.2
NetLED1_4-DIN: ATtiny.3 LED.4-DIN R9.1 | length 14
  Top Layer w0.254: ATtiny.3 119.92,46.355 123.927,50.362 123.927,51.367 LED.4-DIN@124.25,51.69 ; v1(123,55) 123,53.923 123.927,52.996 123.927,52.013 LED.4-DIN@124.25,51.69 ; LED.4-DIN LED.4-DIN@124.25,51.69
  Bottom Layer w0.254: v1(123,55) 123.008,54.992 124.363,54.992 R9.1
NetP1_1: P1.1 Q1.2 | length 9.2
  Bottom Layer w0.635: P1.1 113.665,59.055 117.475,59.055 Q1.2
NetP2_2: ATtiny.1 ISP.2 R8.1 RST.1 RST.2 | length 30.7
  Top Layer w0.254: v1(118,43) 118.066,43.066 118.066,43.609 118.272,43.815 ATtiny.1
  Bottom Layer w0.254: R8.1 R8.1@113.357,46.386 ; v1(118,43) 118,43.544 116.586,44.958 114.785,44.958 R8.1@113.357,46.386 ; RST.1 122.936,53.34 121.031,51.435 ISP.2 118.11,51.139 R8.1@113.357,46.386
NetR1_2: R1.2 R2.1 U1.5 | length 9.5
  Top Layer w0.254: U1.5 99.187,50.439 99.454,50.706 99.56,50.706 101.219,52.365 101.219,53.835 101.285,53.901 101.285,53.914 102.235,54.864 R2.1 R1.2
NetR4_2: R4.2 U1.7 | length 18.6
  Top Layer w0.254: U1.7 96.647,49.449 97.333,48.763 100.706,48.763 101.854,49.911 v1(101.854,50.038)
  Bottom Layer w0.254: R4.2 95.6,42.872 96.81,44.082 96.81,48.296 98.552,50.038 v1(101.854,50.038)
NetR7_1: ATtiny.2 Mode.1 Mode.2 R7.1 | length 24.6
  Top Layer w0.254: ATtiny.2 120.864,45.085 121.499,45.72 v1(121.666,45.72)
  Bottom Layer w0.254: R7.1 118.714,46.386 ; v1(121.666,45.72) 121.561,45.72 120.895,46.386 118.714,46.386 ; Mode.1 121.92,43.18 118.714,46.386
NTC2-1: ATtiny.6 ISP.6 JP1.1 NTC2.1 R11.1 | length 41.8
  Top Layer w0.254: ISP.6 112.912,51.317 112.023,51.317 110.489,49.783 110.489,47.086 111.22,46.355 ATtiny.6 113.02,46.355 115.57,43.805 v1(115.57,40.386)
  Bottom Layer w0.254: v1(115.57,40.386) R11.1 115.897,39.466 116.248,39.115 116.248,38.524 117.8,36.972 ; NTC2.1 117.8,36.972 ; JP1.1 135.255,36.195 133.985,37.465 118.293,37.465 117.8,36.972
PWM_Signal: ATtiny.7 ISP.4 R5.1 | length 20.9
  Top Layer w0.254: ATtiny.7 111.22,45.085 109.981,46.324 109.981,50.021 112.665,52.705 114.3,52.705 ISP.4
  Bottom Layer w0.254: R5.1 116.398,57.15 116.84,56.708 116.84,52.705 ISP.4
pads on no net: "FAN OUT.3" "FAN OUT." LED.2-DOUT U4.1 U4.2 U4.6 U4.7 U4.8

## Polygon pours and split planes (outlines as drawn)
GND on Top Layer "GND_L01_P000" (solid, pour order 0): 92,66 139,66 140.5,64.5 140.5,32.5 139,31 92,31 90.5,32.5 90.5,64.5
GND on Bottom Layer "GND_L02_P001" (solid, pour order 1): 92,66 139,66 140.5,64.5 140.5,32.5 139,31 92,31 90.5,32.5 90.5,64.5

## Silkscreen, mask and mechanical layers (free items; w line width, h text height)
Bottom Overlay:
  text "FAN CONTROLLER v1.0" at 138.75,63.75 h1.5
  text "DeLo // KAI" at 138.8,61.871 h1.2
Mechanical 1:
  the board outline again, w0.254